# Altium PCB PCB4270Z_A00.PcbDoc (part 1 of 3)
Units mm, origin at the board's own origin, x right, y up, seen from the top; angles counter-clockwise.
Board outline 32 x 51 mm, 4 copper layers (Top Layer, Signal Layer 2, Signal Layer 3, Bottom Layer), stack 1.6 mm thick; 106 components, 90 nets, 404 pads, 564 vias.
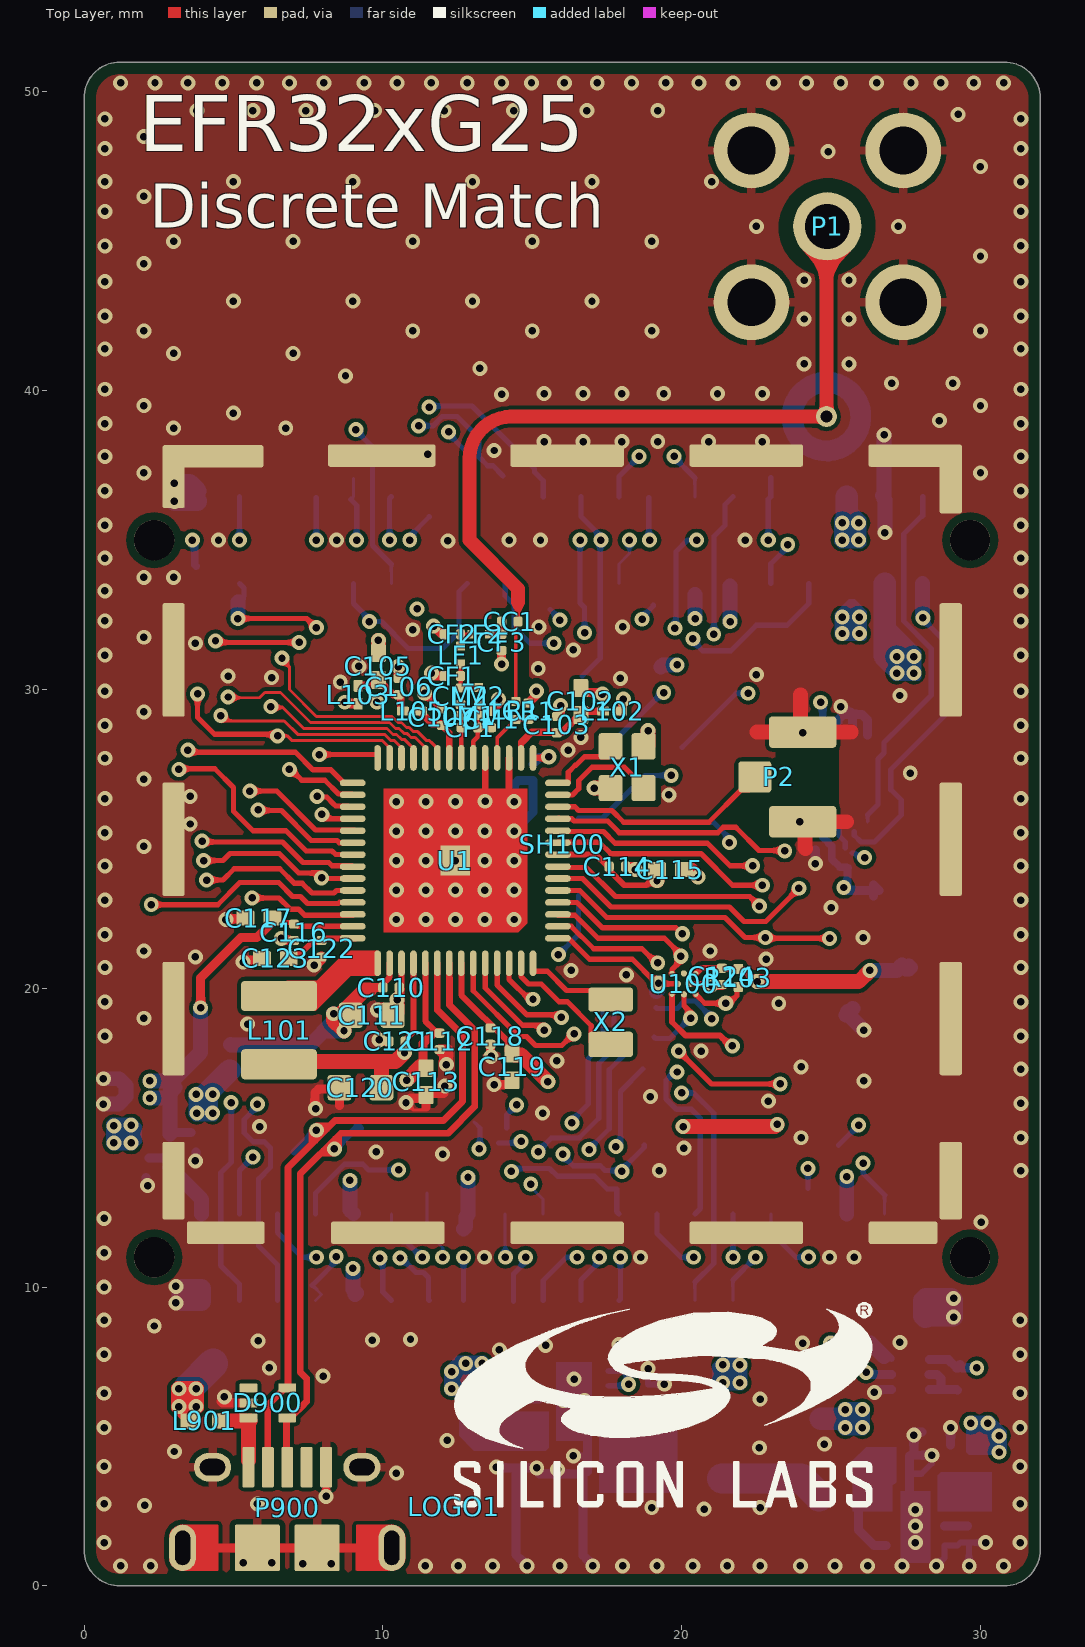
[diagram p0: Top Layer view]
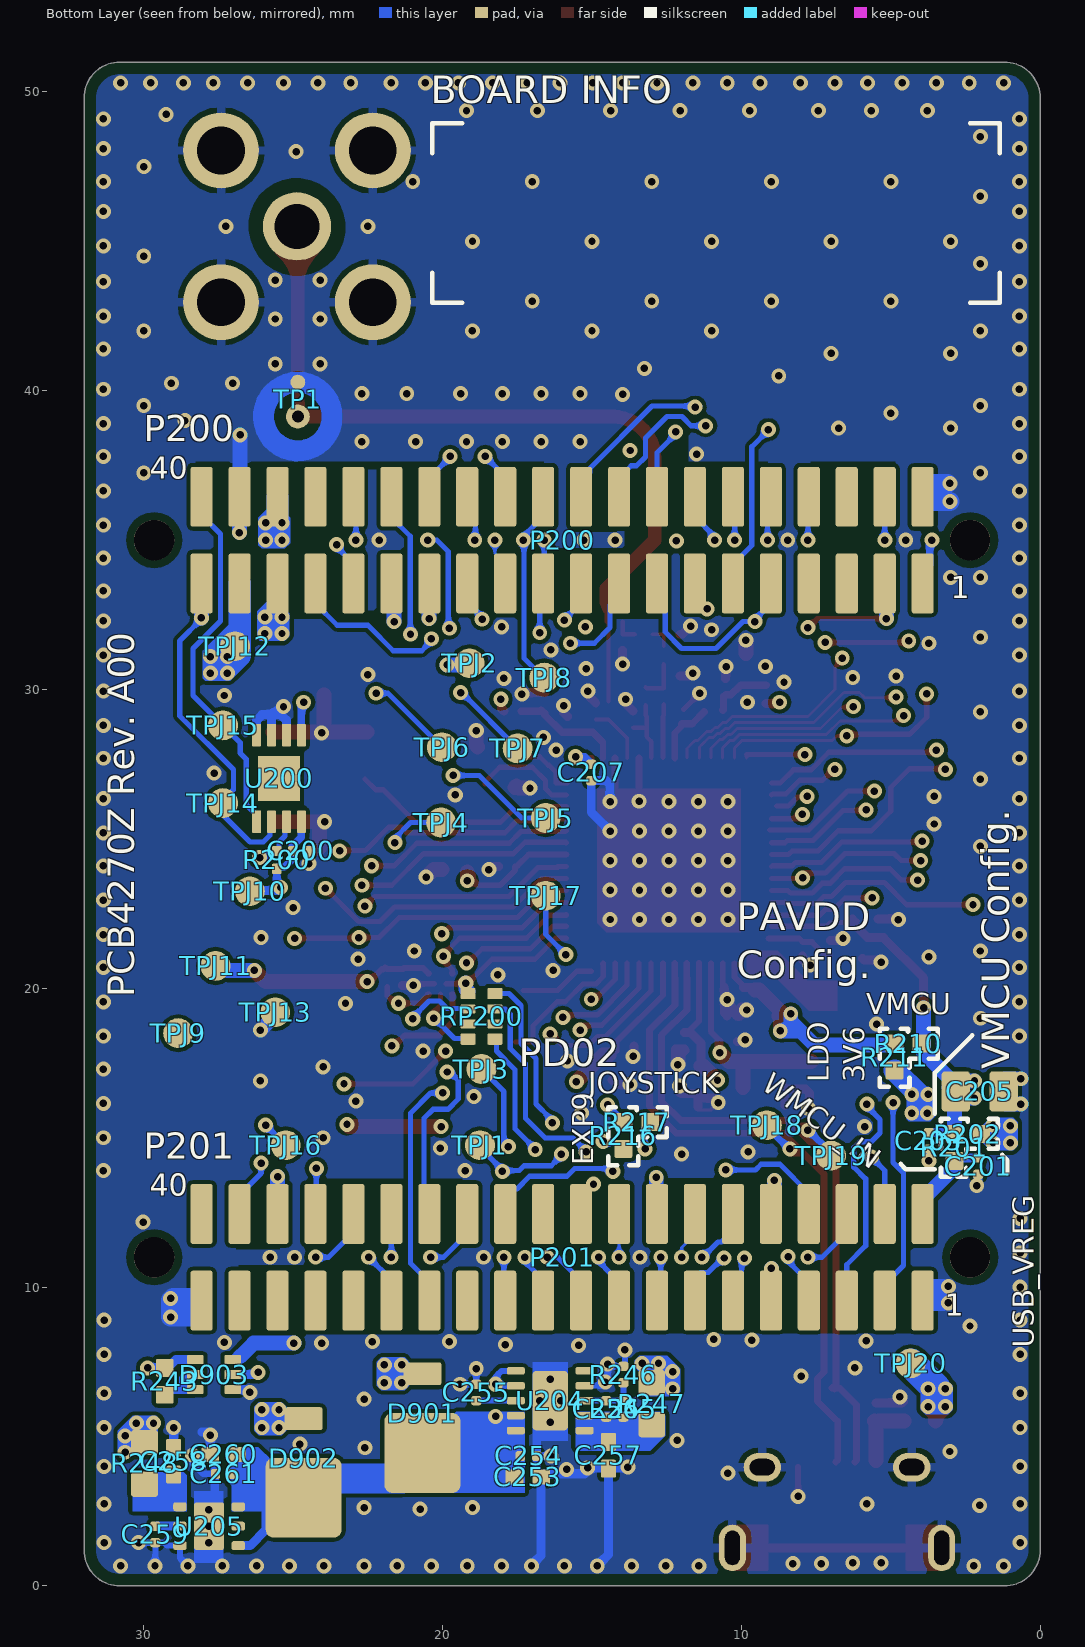
[diagram p1: Bottom Layer view, seen from below]
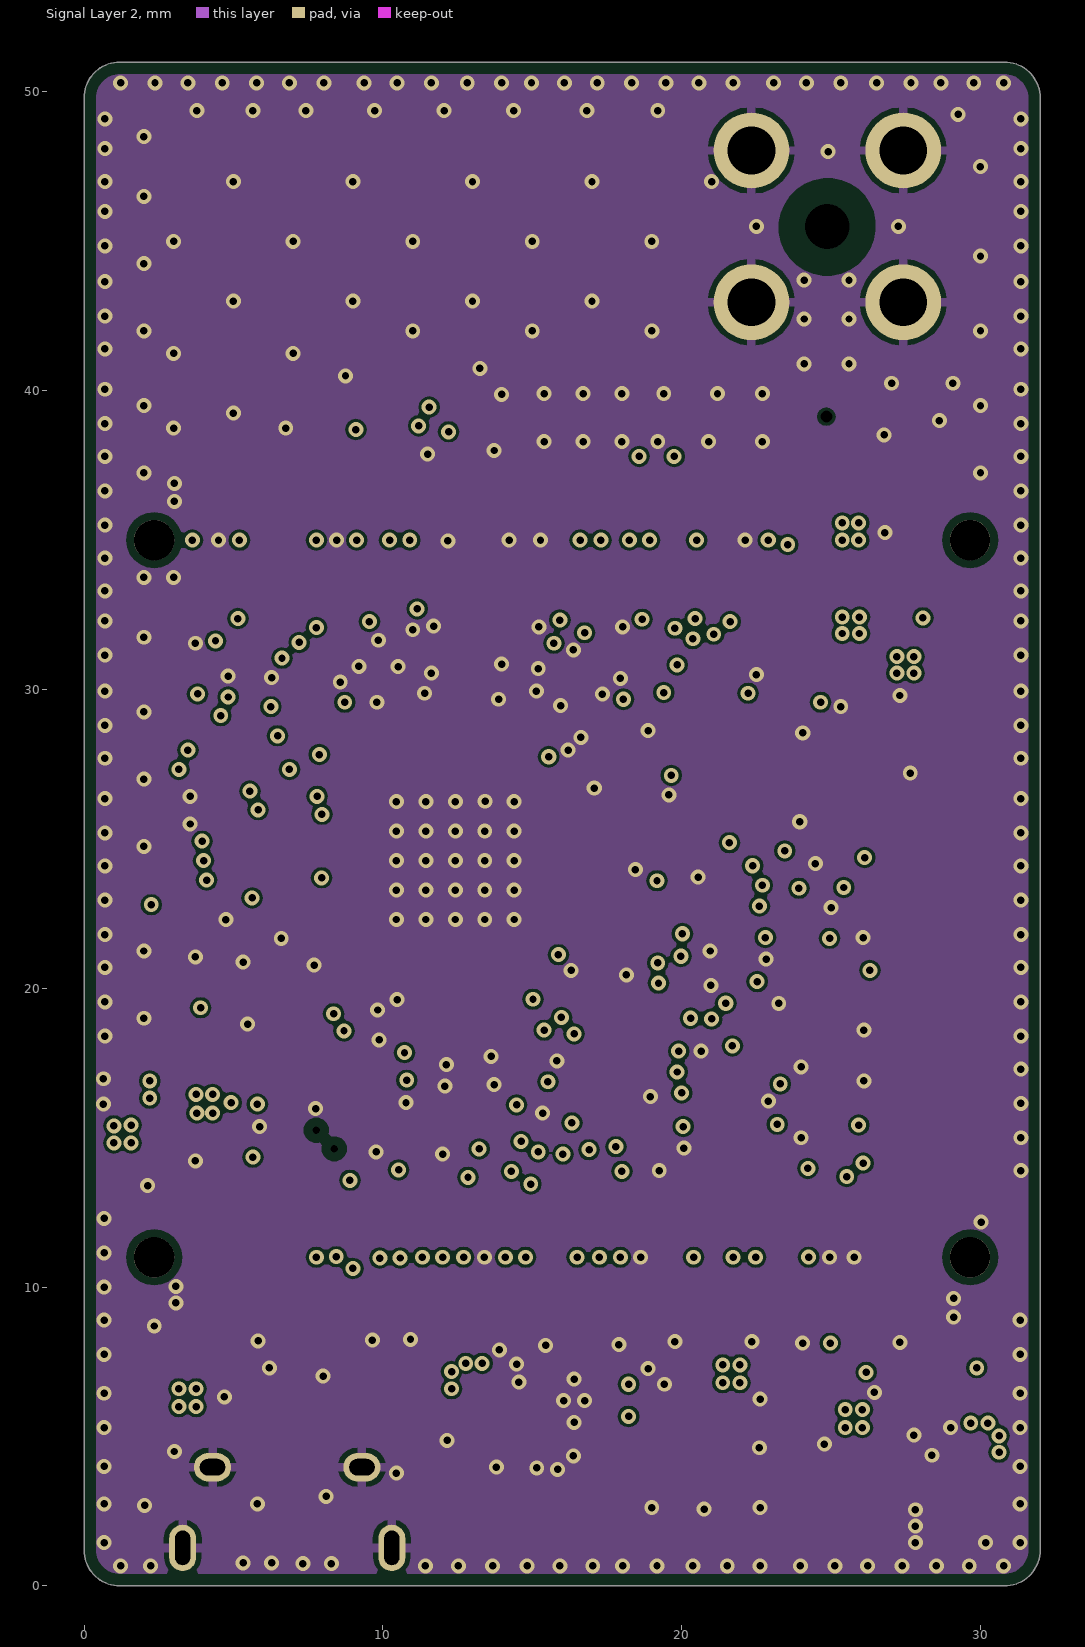
[diagram p2: Signal Layer 2]
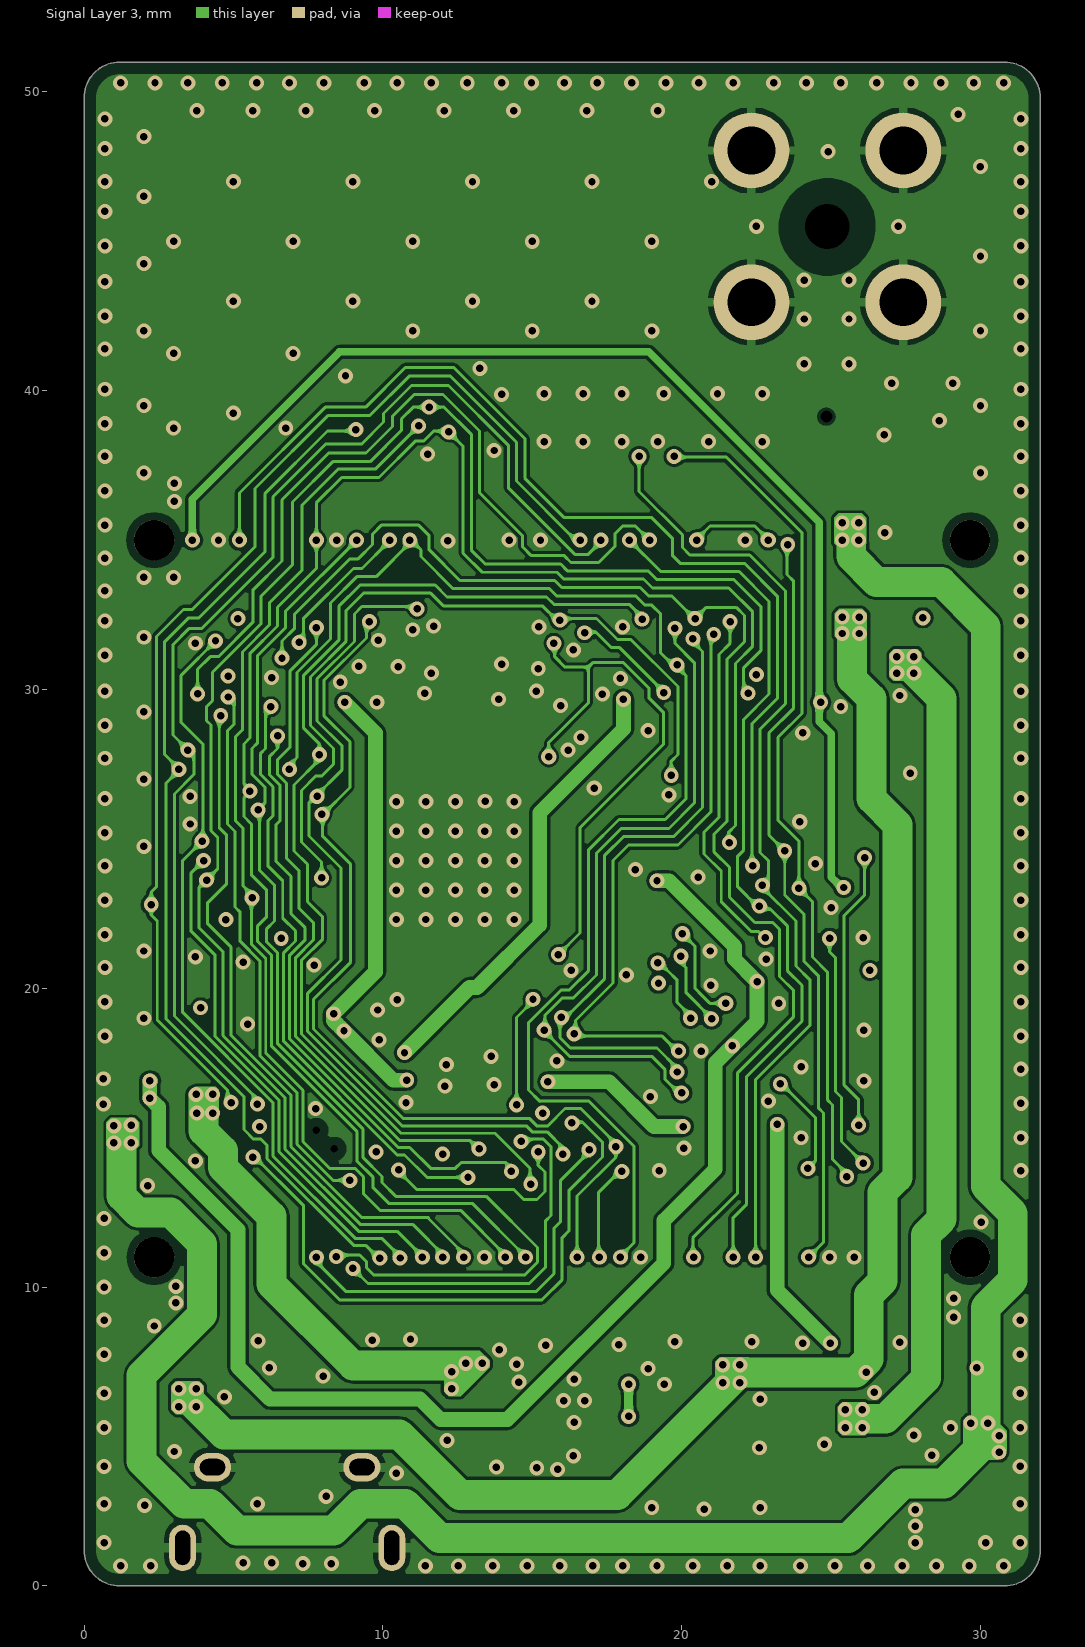
[diagram p3: Signal Layer 3]

## Layer stack, top to bottom
Top Solder: solder mask 0.0102, Solder Resist, Dk 3.5
Top Layer: signal copper 0.035
Dielectric 1: core 0.325, FR-4, Dk 4.2
Signal Layer 2: signal copper 0.018
Dielectric 3: prepreg 0.844, Dk 4.2
Signal Layer 3: signal copper 0.018
Dielectric 2: core 0.325, Dk 4.2
Bottom Layer: signal copper 0.035
Bottom Solder: solder mask 0.0102, Solder Resist, Dk 3.5

## Board outline
0,1.2 ccw(c1.2,1.2) 1.2,0 30.8,0 ccw(c30.8,1.2) 32,1.2 32,49.8 ccw(c30.8,49.8) 30.8,51 1.2,51 ccw(c1.2,49.8) 0,49.8

## Design rules (kind name [scope] priority, off if disabled: settings)
AcuteAngle [All] p1: minimum=7.00000000000000E+0001 checktracksonly=FALSE
BoardOutlineClearance [All] p1: gap=0.4
Clearance Clearance_50Ohm [InNetClass('50Ohm') vs InNet('GND')] p1: gap=0.254 except(0.15: Track-SMDPad; 0.2: SMDPad-SMDPad)
Clearance Clearance_to_Holes [InPadClass('NPTH')] p2: gap=0.254
Clearance Clearance_Outer_Layers_ThinGPIO [All vs OnLayer('Top Layer') and InNetClass('ThinGPIO')] p3: gap=0.1
Clearance Clearance_Outer_Layers [All vs OnLayer('Top Layer') or OnLayer('Bottom Layer')] p4: gap=0.127
Clearance Clearance_Inner_Layers [All vs OnLayer('Signal Layer 2') or OnLayer('Signal Layer 3')] p5: gap=0.1 except(0.175: Via-Via)
HoleToHoleClearance HoleToHoleClearance_ANT1toPAD [Incomponent ('ANT1') vs ISpad] p1: gap=0 allowstackedmicrovias=TRUE
HoleToHoleClearance HoleToHoleClearance_R1toR2_1 [Incomponent ('R1') vs Incomponent ('R2')] p2: gap=0 allowstackedmicrovias=TRUE
HoleToHoleClearance HoleToHoleClearance_U1toVIA_1 [InComponent ('U1') vs IsVia] p3: gap=0 allowstackedmicrovias=TRUE
HoleToHoleClearance [All] p4: gap=0.254 allowstackedmicrovias=TRUE
MinimumSolderMaskSliver [All] p1: minsoldermaskwidth=0.075
PolygonConnect Polygon_VIA_Connect [IsVia] p1: connectstyle=Direct reliefconductorwidth=0.254 reliefentries=4 polygonreliefangle="90 Angle" airgapwidth=0.254
PolygonConnect PolygonConnect_SH100 [InComponent('SH100')] p2: connectstyle=Direct reliefconductorwidth=0.254 reliefentries=4 polygonreliefangle="90 Angle" airgapwidth=0.127
PolygonConnect PolygonConnect_P1 [InComponent('P1') or InComponent('P900')] p3: connectstyle=Relief reliefconductorwidth=0.3 reliefentries=4 polygonreliefangle="90 Angle" airgapwidth=0.175
PolygonConnect [All] p4: connectstyle=NoConnect reliefconductorwidth=0.2 reliefentries=4 polygonreliefangle="90 Angle" airgapwidth=0.125
RoutingVias [All] p1: holewidth=0.3 width=0.65 viastyle="Through Hole" minholewidth=0.25 minwidth=0.5 maxholewidth=1 maxwidth=1.5
ShortCircuit ShortCircuit_ANTtoPAD [InNet('NetAT1_1') vs InNet('GND')] p1: allowed=TRUE
ShortCircuit ShortCircuit_R1toR2_1 [Incomponent ('R1') vs Incomponent ('R2')] p2: allowed=TRUE
ShortCircuit [All] p3: allowed=FALSE
SilkToSilkClearance [All] p1: silktosilkclearance=0.102
SilkToSolderMaskClearance [IsPad] p1: minsilkscreentomaskgap=0.102 clearancetoexposedcopper=TRUE
SolderMaskExpansion [All] p1: expansion=0.051
Width 50ohm [InNet('50R*')] p1: maxlimit=0.457 minlimit=0.124 preferedwidth=0.457
Width [All] p2: maxlimit=5.08 minlimit=0.1 preferedwidth=0.125
25 further rules are at their usual default settings.

## Classes and differential pairs
component class "05_ WSTK Connectors & B": C200 P200 P201 R200 TPJ1 TPJ2 TPJ3 TPJ4 TPJ5 TPJ6 TPJ7 TPJ8 TPJ9 TPJ10 TPJ11 TPJ12 TPJ13 TPJ14 TPJ15 TPJ16 TPJ17 TPJ18 TPJ19 TPJ20 U200
component class "04_ EFR32 Signal Assign": C124 C207 P2 R103 R216 R217 RP200 U1 U100 X2
component class "03_ Board Power": C201 C203 C205 C253 C254 C255 C256 C257 C258 C259 C260 C261 D900 D901 D902 D903 L901 P900 R201 R202 R243 R245 R246 R247 R248 U204 U205
component class "02_ RF & Power": C102 C103 C105 C106 C107 C110 C111 C112 C113 C114 C115 C116 C117 C118 C119 C120 C121 C122 C123 CC1 CF1 CF2 CF3 CM1 CM2 CP1 CR1 L101 L102 L103 L105 LF1 LF2 LM1 LM2 LR1 P1 R210 R211 SH100 SH101 TP1 X1
component class "01_ Title Page": PCB1
net class WSTK_P[45..0]: WSTK_P1 WSTK_P3 WSTK_P5 WSTK_P6 WSTK_P7 WSTK_P12 WSTK_P13 WSTK_P19 WSTK_P22 WSTK_P28 WSTK_P30 WSTK_P32 WSTK_P34 WSTK_P36 WSTK_P37 WSTK_P38 WSTK_P39 WSTK_P40
net class WSTK_F[21..0]: WSTK_F4 WSTK_F10 WSTK_F11 WSTK_F12 WSTK_F13 WSTK_F14 WSTK_F15 WSTK_F16 WSTK_F17 WSTK_F18 WSTK_F19 WSTK_F20 WSTK_F21
pad class NPTH: P200-M1 P200-M2 P201-M1 P201-M2
net class EFR32_PA[11..0]: EFR32_PA0 EFR32_PA1 EFR32_PA2 EFR32_PA3 EFR32_PA4 EFR32_PA5 EFR32_PA6 EFR32_PA7 EFR32_PA8 EFR32_PA9 EFR32_PA10 EFR32_PA11

## Components (designator, comment, footprint, x,y, rotation, side; value= is the part's Value field where it differs from the comment)
C102 "1U" C0402_L 16.625,29.6 r90 top
C103 "100P" C0201_L 15.825,28.825 r90 top
C105 "470N" C0402_L 9.85,30.775 r90 top
C106 "100P" C0201_L 10.525,30.1 r90 top
C107 "100P" C0201_L 11.975,29.075 r90 top
C110 "100N" C0201_L 10.275,20.025 r0 top
C111 "10U" C0603_L 9.625,19.1 r0 top
C112 "10N" C0201_L 11.9,18.225 r270 top
C113 "1U" C0402_L 11.45,16.875 r270 top
C114 "100N" C0201_L 17.85,24.075 r0 top
C115 "1U" C0402_L 19.625,23.975 r0 top
C116 "100N" C0201_L 7.025,21.875 r270 top
C117 "1U" C0402_L 5.85,22.35 r180 top
C118 "100N" C0201_L 13.6,18.4 r270 top
C119 "1U" C0402_L 14.325,17.375 r270 top
C120 "4U7" C0603_L 9.25,16.675 r180 top
C121 "100N" C0201_L 10.475,18.225 r180 top
C122 "100N" C0201_L 7.95,21.325 r270 top
C123 "1U" C0402_L 6.4,21 r180 top
C124 "100N" C0201_L 21.35,20.4 r270 top
C200 "100N" C0201_L 24.75,24.6 r180 bottom
C201 "100N" C0201_L 2.075,14.05 r270 bottom
C203 "100N" C0201_L 3.725,14.9 r270 bottom
C205 "10U" C0805_L 2.025,16.55 r180 bottom
C207 "100N" C0201_L 15.025,27.225 r270 bottom
C253 "1U" C0402_L 17.15,3.65 r180 bottom
C254 "100N" C0201_L 17.125,4.35 r180 bottom
C255 "100N" C0201_L 18.875,6.475 r90 bottom
C256 "10N" C0201_L 14.525,5.925 r90 bottom
C257 "10U" C0402_L 14.45,4.375 r270 bottom
C258 "2U2" C0402_L 29,4.175 r90 bottom
C259 "100N" C0201_L 29.615,1.725 r270 bottom
C260 "1U" C0402_L 27.325,4.4 r0 bottom
C261 "100N" C0201_L 27.325,3.75 r0 bottom
CC1 "100pF" C0201_L 14.25,32.275 r0 top
CF1 "4.7pF" C0201_L 12.325,30.45 r180 top
CF2 "10pF" C0201_L 12.325,31.85 r180 top
CF3 "5.1pF" C0201_L 13.975,31.575 r270 top
CM1 "10pF" C0201_L 13.625,29 r90 top
CM2 "4.3pF" C0201_L 12.6,29.775 r90 top
CP1 "1.5pF" C0201_L 12.9,28.725 r0 top
CR1 "Unused" C0201_L 14.875,29.275 r90 top
D900 "SP1001-04" SOT553_L 6.15,6.125 r0 top
D901 "SS3P3" DO-220AA 20.675,5.3 r90 bottom
D902 "SS3P3" DO-220AA 24.65,3.8 r90 bottom
D903 "FDY4000CZ" SOT-563 27.65,7.075 r0 bottom
Designator39 "Comment" PCB_SPEC_4_LAYER -67.7,114.2 r0 top
L101 "2U2" COIL_1008_L 6.525,18.6 r270 top
L102 "BLM03AG700SN1D" COIL_MUR_BLM03_0201 17.675,29.275 r180 top
L103 "0R" COIL_MUR_BLM03_0201 9.175,29.825 r90 top
L105 "BLM03PG330SN1D" COIL_MUR_BLM03_0201 10.975,29.275 r0 top
L901 "782422221" COIL_0402 4.025,5.525 r180 top
LF1 "6.8nH" COIL_0201_L 12.6,31.15 r90 top
LF2 "6.8nH" COIL_0201_L 13.275,31.85 r0 top
LM1 "22nH" COIL_0201_L 12.9,29.125 r0 top
LM2 "5.6nH" COIL_0201_L 13.2,29.775 r90 top
LOGO1 "Comment" LOGO_SILABS_W14.0 12.375,2.65 r0 top
LR1 "20nH" COIL_0201_L 14.45,29.3 r90 top
P1 "SMA" TE_SMA_1814832_TH_VER 24.875,45.5 r0 top
P2 "U.FL" HIROSE_U.FL-R-SMT-1 24.05,27.075 r90 top
P200 "SOCKET_WCON_2X20_1.27MM_SMD" SAM_SFC-120-T2-D-A-2X20_SNUM 16,35 r0 bottom locked
P201 "SOCKET_WCON_2X20_1.27MM_SMD" SAM_SFC-120-T2-D-A-2X20_SNUM 16,11 r0 bottom locked
P900 "USB MICRO-B" AMP_FCI_10118194 6.805,-0.175 r0 top
R103 "330K" R0201_L#1 21.9,20.35 r90 top
R200 "10K" R0201_L#1 25.55,24.3 r270 bottom
R201 "0R" R0402_L 2.875,14.675 r270 bottom
R202 "0R" R0402_L 2.425,15.125 r180 bottom
R210 "0R" R0402_L 4.425,18.15 r0 bottom
R211 "0R" R0402_L 4.875,17.7 r90 bottom
R216 "0R" R0402_L 13.95,15.075 r90 bottom
R217 "0R" R0402_L 13.5,15.525 r180 bottom
R243 "33k" R0402_L 29.3,6.85 r270 bottom
R245 "4.02k" R0201_L#2 13.95,5.925 r270 bottom
R246 "1.15k" R0201_L#2 13.95,7.075 r270 bottom
R247 "0R" R0603_L 13,6.1 r90 bottom
R248 "0R" R0603_L 29.975,4.1 r90 bottom
RP200 "100R" RES_MNR04-8_PCB4270 18.7,19.062 r270 bottom
SH100 "RF_SHIELD_FRAME_BMI-S-203-F" RF_SHIELD_FRAME_BMI-S-203-F_PCB4270 16,24.825 r0 top locked
TP1 "TP_RF" "TP_INGUN_50_OHM_CLOSED OPENVIA" 24.845,39.135 r0 bottom
TPJ1 "TPJ_SMD" TP_1.0_SMD 18.75,14.75 r90 bottom locked
TPJ2 "TPJ_SMD" TP_1.0_SMD 19.1,30.88 r90 bottom locked
TPJ3 "TPJ_SMD" TP_1.0_SMD 18.7,17.3 r90 bottom locked
TPJ4 "TPJ_SMD" TP_1.0_SMD 20.05,25.55 r90 bottom locked
TPJ5 "TPJ_SMD" TP_1.0_SMD 16.55,25.7 r90 bottom locked
TPJ6 "TPJ_SMD" TP_1.0_SMD 20.02,28.07 r90 bottom locked
TPJ7 "TPJ_SMD" TP_1.0_SMD 17.49,28.03 r90 bottom locked
TPJ8 "TPJ_SMD" TP_1.0_SMD 16.6,30.4 r90 bottom locked
TPJ9 "TPJ_SMD" TP_1.0_SMD 28.85,18.5 r90 bottom locked
TPJ10 "TPJ_SMD" TP_1.0_SMD 26.45,23.25 r90 bottom locked
TPJ11 "TPJ_SMD" TP_1.0_SMD 27.6,20.75 r90 bottom locked
TPJ12 "TPJ_SMD" TP_1.0_SMD 26.95,31.45 r90 bottom locked
TPJ13 "TPJ_SMD" TP_1.0_SMD 25.6,19.2 r90 bottom locked
TPJ14 "TPJ_SMD" TP_1.0_SMD 27.35,26.2 r90 bottom locked
TPJ15 "TPJ_SMD" TP_1.0_SMD 27.35,28.8 r90 bottom locked
TPJ16 "TPJ_SMD" TP_1.0_SMD 25.25,14.75 r90 bottom locked
TPJ17 "TPJ_SMD" TP_1.0_SMD 16.55,23.1 r90 bottom locked
TPJ18 "TPJ_SMD" TP_1.0_SMD 9.15,15.42 r90 bottom locked
TPJ19 "TPJ_SMD" TP_1.0_SMD 7,14.4 r90 bottom locked
TPJ20 "TPJ_SMD" TP_1.0_SMD 4.34,7.45 r90 bottom locked
U1 "EFR32FG25B222F1920IM56" QFN56_M040_7.0X7.0_EP_SL 12.425,24.275 r180 top
U100 "MX25R8035F" BGA8_M040_1.24X1.75_WLCSP_PCB4270 20.075,20.15 r270 top
U200 "M24C02" TDFN8_M050_2.0X3.0_EP 25.475,27.025 r270 bottom
U204 "TPS7A92" WFDFN-10_EP_TPS7A92 16.4,6.2 r0 bottom
U205 "TPS79933DRVR" SON-6_EP_TPS79933DDCR 27.815,2 r180 bottom
X1 "39.000 MHz" KDS_DSX211SH_2016 18.175,27.4 r270 top
X2 "32.768 kHz" X_MCS_CM8V-T1A 17.625,18.875 r270 top

## Footprints (in the part's own frame and the unit in brackets; to place one, negate y for a bottom-side part, rotate by r counter-clockwise, add the part's x,y. Pads: shape width x height; smd on the part's side, far side on the other; paste and mask are expansions set on the pad)
AMP_FCI_10118194 [mm] "Amphenol FCI, 10118194-000XLF, Micro USB Type B (171108)"
  rrect20% 0.4x1.35 smd mask+0.076: 1(-1.305,4.15) 2(-0.655,4.15) 3(-0.005,4.15) 4(0.645,4.15) 5(1.295,4.15)
  oval 1.25x0.95 hole 0.55 slot 0.85 at 0 deg: 6(-2.505,4.15) 7(2.495,4.15)
  oval 0.9x1.55 hole 0.5 slot 1.15 at 90 deg paste+0: 8(-3.505,1.45) 9(3.495,1.45)
  rrect5% 1.5x1.55 smd: 10(-1.005,1.45) 11(0.995,1.45)
  Top Layer region: -3.501,0.676 -2.33,0.676 -2.306,0.7 -2.308,2.206 -2.33,2.228 -3.497,2.228 -3.587,2.228 -3.754,2.159 -3.881,2.031 -3.95,1.865 -3.95,1.775 -3.95,1.775 -3.95,1.125 -3.95,1.036 -3.882,0.871 -3.755,0.744 -3.59,0.676 -3.501,0.676
  Top Layer region: 3.476,0.676 2.32,0.676 2.296,0.7 2.298,2.206 2.32,2.228 3.472,2.228 3.567,2.228 3.743,2.155 3.877,2.021 3.95,1.845 3.95,1.75 3.95,1.75 3.95,1.15 3.95,1.056 3.878,0.882 3.744,0.748 3.57,0.676 3.476,0.676
  body extent -4.05,-1.18 4,4.4, height 3.12
BGA8_M040_1.24X1.75_WLCSP_PCB4270 [mm] "BGA, 8 pin. U100"
  round 0.17 smd paste+0.02 mask+0.058: A1(-0.35,0.4) A3(0.35,0.4) E1(-0.35,-0.4) E3(0.35,-0.4)
  round 0.21 smd mask+0.038: B2(0,0.2) C1(-0.35,0) C3(0.35,0) D2(0,-0.2)
  Top Layer region: -0.263,-0.341 -0.263,-0.459 -0.301,-0.493 -0.35,-0.505 -0.35,-0.505 -0.403,-0.491 -0.441,-0.452 -0.455,-0.4 -0.455,-0.4 -0.447,-0.36 -0.424,-0.326 -0.39,-0.303 -0.35,-0.295 -0.35,-0.295 -0.301,-0.307 -0.263,-0.341
  Top Layer region: -0.263,0.459 -0.263,0.341 -0.301,0.307 -0.35,0.295 -0.35,0.295 -0.403,0.309 -0.441,0.348 -0.455,0.4 -0.455,0.4 -0.447,0.44 -0.424,0.474 -0.39,0.497 -0.35,0.505 -0.35,0.505 -0.301,0.493 -0.263,0.459
  Top Layer region: 0.263,0.341 0.263,0.459 0.301,0.493 0.35,0.505 0.35,0.505 0.403,0.491 0.441,0.452 0.455,0.4 0.455,0.4 0.447,0.36 0.424,0.326 0.39,0.303 0.35,0.295 0.35,0.295 0.301,0.307 0.263,0.341
  Top Layer region: 0.263,-0.459 0.263,-0.341 0.301,-0.307 0.35,-0.295 0.35,-0.295 0.403,-0.309 0.441,-0.348 0.455,-0.4 0.455,-0.4 0.447,-0.44 0.424,-0.474 0.39,-0.497 0.35,-0.505 0.35,-0.505 0.301,-0.493 0.263,-0.459
  body extent -0.63,-0.89 0.63,0.88, height 0.52
C0201_L [mm] "Capacitor, Chip; 0.60 mm L X 0.30 mm W X 0.33 mm H body"
  rrect52% 0.31x0.34 smd: 1(-0.275,0) 2(0.275,0)
  body extent -0.3,-0.15 0.3,0.15, height 0.3
C0402_L [mm] "Chip Capacitor, 2-Leads, Body 1.0x0.5mm, IPC High Density"
  rrect20% 0.6x0.5 smd mask+0.051: 1(-0.45,0) 2(0.45,0)
  body extent -0.5,-0.25 0.5,0.25, height 0.6
C0603_L [mm] "Capacitor, 0603, High Density (C)"
  rrect25% 0.8x0.85 smd: 1(-0.7,0) 2(0.7,0)
  body extent -0.8,-0.4 0.8,0.4, height 0.95
C0805_L [mm] "Capacitor, 0805"
  rrect25% 0.95x1.35 smd: 1(-0.8,0) 2(0.8,0)
  body extent -1.1,-0.72 1.1,0.72, height 1.45
COIL_0201_L [mm] "JELF243C-0021"
  rrect10% 0.3x0.3 smd: 1(-0.3,0) 2(0.3,0)
  body extent -0.32,-0.17 0.32,0.17, height 0.33
COIL_0402 [mm] "COIL_0402_L (3D from Wurth) (190308)"
  rrect20% 0.55x0.5 smd mask+0.051: 1(-0.525,0) 2(0.525,0)
  body extent -0.5,-0.25 0.5,0.25, height 0.5
COIL_1008_L [mil] "Chip Inductors, 1008 (2520), Coilcraft (190207)"
  rrect25% 40x100 smd: 1(-45,0) 2(45,0)
  body extent -58,-55 57,55, height 80
COIL_MUR_BLM03_0201 [mm] "COIL_MUR_BLM03_0201"
  rrect25% 0.4x0.3 smd mask+0.051: 1(-0.3,0) 2(0.3,0)
  body extent -0.3,-0.15 0.3,0.15, height 0.95
DO-220AA [mm] "Diode DO220AA (DO-220AA) (= SMP) (Vishay)"
  rrect20% 2.67x2.54 smd: 1(-0.85,0)
  rrect20% 0.762x1.27 smd: 2(1.8,0)
  body extent -2,-1.09 2.1,1.09, height 1.15
HIROSE_U.FL-R-SMT-1 [mm] "COAX_HIROSE_U.FL_CL331-0471"
  rrect20% 1.05x1.1 smd mask+0.051: 1(0,1.6)
  rrect20% 1.05x2.25 smd mask+0.051: 2(-1.5,0) 3(1.5,0)
  Top Layer pour cut-out: -0.85,0.9 0.85,0.9 0.85,0.9 0.85,-1.2 -0.85,-1.2 -0.85,-1.2
  body extent -1.3,-1.55 1.3,1.3, height 0.9
KDS_DSX211SH_2016 [mm] "Copy of Silabs CE  X_KDS_DSX211SH_2.0X1.65-4"
  rrect20% 0.875x0.8 smd mask+0.051: 1(-0.7,-0.55) 2(0.7,-0.55) 3(0.7,0.55) 4(-0.7,0.55)
  body extent -1.07,-0.87 1.08,0.88, height 0.5
LOGO_SILABS_W14.0 [mm] "LOGO_SILABS_W14.0"
  silkscreen extent 0.03,0 13.99,6.83
PCB_SPEC_4_LAYER [mm]
QFN56_M040_7.0X7.0_EP_SL [mm]
  rect 1x1 smd: 0(0,0)
  oval 0.86x0.22 smd: 1(-3.435,2.6) 2(-3.435,2.2) 3(-3.435,1.8) 4(-3.435,1.4) 5(-3.435,1) 6(-3.435,0.6) 7(-3.435,0.2) 8(-3.435,-0.2) 9(-3.435,-0.6) 10(-3.435,-1) 11(-3.435,-1.4) 12(-3.435,-1.8) 13(-3.435,-2.2) 14(-3.435,-2.6) 29(3.435,-2.6) 30(3.435,-2.2) 31(3.435,-1.8) 32(3.435,-1.4) 33(3.435,-1) 34(3.435,-0.6) 35(3.435,-0.2) 36(3.435,0.2) 37(3.435,0.6) 38(3.435,1) 39(3.435,1.4) 40(3.435,1.8) 41(3.435,2.2) 42(3.435,2.6)
  oval 0.22x0.86 smd: 15(-2.6,-3.435) 16(-2.2,-3.435) 17(-1.8,-3.435) 18(-1.4,-3.435) 19(-1,-3.435) 20(-0.6,-3.435) 21(-0.2,-3.435) 22(0.2,-3.435) 23(0.6,-3.435) 24(1,-3.435) 25(1.4,-3.435) 26(1.8,-3.435) 27(2.2,-3.435) 28(2.6,-3.435) 43(2.6,3.435) 44(2.2,3.435) 45(1.8,3.435) 46(1.4,3.435) 47(1,3.435) 48(0.6,3.435) 49(0.2,3.435) 50(-0.2,3.435) 51(-0.6,3.435) 52(-1,3.435) 53(-1.4,3.435) 54(-1.8,3.435) 55(-2.2,3.435) 56(-2.6,3.435)
  Top Layer pour cut-out: -3,-2.675 -2.675,-3 2.725,-3 3,-2.725 3,2.75 2.75,3 -2.725,3 -3,2.725
  Top Layer region: 2.4,-2.4 -2.4,-2.4 -2.4,2.1 -2.1,2.4 2.4,2.4
  body extent -3.5,-3.5 3.5,3.5, height 0.86
R0201_L#1 [mm] "Resistor (Chip2PinSM127P600-8N) (170921)"
  rrect25% 0.34x0.32 smd: 1(-0.3,0) 2(0.3,0)
  body extent -0.32,-0.13 0.32,0.13, height 0.3
R0201_L#2 [mm] "Resistor, Chip; 0.60 mm L X 0.30 mm W X 0.28 mm H body"
  rrect52% 0.31x0.34 smd: 1(-0.275,0) 2(0.275,0)
  body extent -0.3,-0.15 0.3,0.15, height 0.23
R0402_L [mm] "Chip Resistor, 2-Leads, Body 1.0x0.5mm, IPC High Density"
  rrect20% 0.6x0.6 smd mask+0.051: 1(-0.45,0) 2(0.45,0)
  body extent -0.5,-0.25 0.5,0.25, height 0.6
R0603_L [mm] "Chip Resistor, 0603, High density, Level C (_L) (170210)"
  rrect25% 0.85x0.9 smd: 1(-0.7,0) 2(0.7,0)
  body extent -0.8,-0.4 0.8,0.4, height 0.95
RES_MNR04-8_PCB4270 [mm] "Chip resistor network 8pin"
  rrect20% 0.375x0.5 smd mask+0.051: 1(-0.763,-0.45) 4(0.763,-0.45) 5(0.763,0.45) 8(-0.763,0.45)
  rrect20% 0.3x0.5 smd mask+0.051: 2(-0.25,-0.45) 3(0.25,-0.45) 6(0.25,0.45) 7(-0.25,0.45)
  body extent -1,-0.4 1,0.4, height 0.5
RF_SHIELD_FRAME_BMI-S-203-F_PCB4270 [mm] "RF_SHIELD_FRAME_BMI-S-203-F"
  rrect20% 0.75x3.8 smd paste+0 mask+0.05: 1(-13.005,-5.835) 1(-13.005,0.165) 1(-13.005,6.165) 1(13.005,-5.835) 1(13.005,0.165) 1(13.005,6.165)
  rrect20% 0.75x2.6 smd paste+0 mask+0.05: 1(-13.005,-11.259) 1(13.005,-11.259)
  rrect20% 0.75x2.1 smd paste+0 mask+0.05: 1(-13.005,12.294)
  oval 0.75x0.254 smd paste+0 mask+0.05: 1(-13.004,12.994) 1(12.994,12.994) 1(12.994,12.994) 1(12.994,12.994)
  rrect20% 3.375x0.75 smd paste+0 mask+0.05: 1(-11.684,12.979)
  rrect20% 2.6x0.75 smd paste+0 mask+0.05: 1(-11.259,-13.005)
  rrect20% 3.6x0.75 smd paste+0 mask+0.05: 1(-6.035,13.005)
  rrect20% 3.8x0.75 smd paste+0 mask+0.05: 1(-5.835,-13.005) 1(0.165,-13.005) 1(0.165,13.005) 1(6.165,-13.005) 1(6.165,13.005)
  rrect20% 2.3x0.75 smd paste+0 mask+0.05: 1(11.411,-13.005)
  rrect20% 3.125x0.75 smd paste+0 mask+0.05: 1(11.811,13.005)
  rrect20% 0.75x2.3 smd paste+0 mask+0.05: 1(13.005,12.217)
  body extent -13.3,-13.3 13.3,13.3, height 5.5
SAM_SFC-120-T2-D-A-2X20_SNUM [mm]
  rrect20% 0.74x2 smd mask+0.05: 1(-12.065,1.45) 2(-12.065,-1.45) 3(-10.795,1.45) 4(-10.795,-1.45) 5(-9.525,1.45) 6(-9.525,-1.45) 7(-8.255,1.45) 8(-8.255,-1.45) 9(-6.985,1.45) 10(-6.985,-1.45) 11(-5.715,1.45) 12(-5.715,-1.45) 13(-4.445,1.45) 14(-4.445,-1.45) 15(-3.175,1.45) 16(-3.175,-1.45) 17(-1.905,1.45) 18(-1.905,-1.45) 19(-0.635,1.45) 20(-0.635,-1.45) 21(0.635,1.45) 22(0.635,-1.45) 23(1.905,1.45) 24(1.905,-1.45) 25(3.175,1.45) 26(3.175,-1.45) 27(4.445,1.45) 28(4.445,-1.45) 29(5.715,1.45) 30(5.715,-1.45) 31(6.985,1.45) 32(6.985,-1.45) 33(8.255,1.45) 34(8.255,-1.45) 35(9.525,1.45) 36(9.525,-1.45) 37(10.795,1.45) 38(10.795,-1.45) 39(12.065,1.45) 40(12.065,-1.45)
  round 1.35 hole 1.35 unplated paste-5.563 mask-5.563: M1(13.652,0) M2(-13.652,0)
  body extent -14.29,-2.1 14.29,2.16, height 4.67
SON-6_EP_TPS79933DDCR [mm]
  rrect50% 0.45x0.3 smd mask+0.05: 1(-0.975,0.65) 2(-0.975,0) 3(-0.975,-0.65) 4(0.975,-0.65) 5(0.975,0) 6(0.975,0.65)
  rrect15% 1x1.6 smd paste-2 mask+0.05: 7(0,0)
  rrect25% 1x0.7 on Bottom Paste paste+0: ""(0,-0.45) ""(0,0.45)
  body extent -1.04,-1.04 1.04,1.04, height 0.76
SOT553_L [mm] "SOT553 (_M050_W1.2_), 5-Leads, Body 1.60x1.20mm, Pitch 0.5mm, HiDens (180615)"
  rrect25% 0.6x0.3 smd: 1(-0.65,0.5) 2(-0.65,0) 3(-0.65,-0.5) 4(0.65,-0.5) 5(0.65,0.5)
  body extent -0.65,-0.85 0.65,0.85, height 0.6
SOT-563 [mm] "diodes DT1446-04V"
  rrect20% 0.55x0.3 smd paste+0 mask+0.051: 1(-0.625,0.5) 2(-0.625,0) 3(-0.625,-0.5) 4(0.625,-0.5) 5(0.625,0) 6(0.625,0.5)
  body extent -0.6,-0.8 0.6,0.8, height 0.61
TDFN8_M050_2.0X3.0_EP [mm] "TDFN8_M050_2.0x3.0_EP"
  rrect20% 0.75x0.3 smd mask+0.051: 1(-1.45,0.75) 2(-1.45,0.25) 3(-1.45,-0.25) 4(-1.45,-0.75) 5(1.45,-0.75) 6(1.45,-0.25) 7(1.45,0.25) 8(1.45,0.75)
  rect 1.5x1.4 smd mask+0.051: 9(0,0)
  body extent -1.5,-1 1.5,1, height 1.01
TE_SMA_1814832_TH_VER [mm]
  round 2.286 / inner round 0 / far side round 2.286 hole 1.5: 1(0,0)
  round 2.54 hole 1.6: 2(-2.54,-2.54) 3(2.54,-2.54) 4(2.54,2.54) 5(-2.54,2.54)
  body extent -3.2,-3.2 3.2,3.2, height 9.5
TP_1.0_SMD [mm] "Test Point, 1.0 mm, SMD"
  round 1 smd paste-0.501: 1(0,0)
  body extent -0.2,-0.2 0.2,0.2, height 0.01
"TP_INGUN_50_OHM_CLOSED OPENVIA" [mm] "TP_INGUN_50_OHM_CLOSED"
  round 0.8 / inner round 0 / far side round 0.7 hole 0.4 mask+0: 1(0,0)
  round 0.5 smd paste-0.255 mask-0.41: 2(0,-1.15)
  Top Layer pour cut-out: 0,-0.8 0.4,-0.693 0.693,-0.4 0.8,0 0.693,0.4 0.4,0.693 0,0.8 0,0.8 -0.347,0.721 -0.625,0.499 -0.78,0.178 -0.78,-0.178 -0.625,-0.499 -0.347,-0.721 0,-0.8
  Top Layer lines w0.7: -1.15,0 ccw(c0,0) 0,-1.15 ccw(c0,0) -1.15,0
WFDFN-10_EP_TPS7A92 [mm]
  rrect50% 0.6x0.25 smd mask+0.05: 1(-1.15,1) 2(-1.15,0.5) 3(-1.15,0) 4(-1.15,-0.5) 5(-1.15,-1) 6(1.15,-1) 7(1.15,-0.5) 8(1.15,0) 9(1.15,0.5) 10(1.15,1)
  rrect25% 1.2x2 smd paste-2 mask+0.05: 11(0,0)
  rrect15% 1.13x0.89 on Bottom Paste paste+0: ""(0,-0.525) ""(0,0.525)
  body extent -1.25,-1.25 1.25,1.25, height 0.76
X_MCS_CM8V-T1A [mm] "Crystal MCS CM8V-T1A (2 pin)"
  rrect25% 0.8x1.5 smd mask+0.051: 1(-0.75,0)
  rrect25% 0.85x1.5 smd mask+0.051: 2(0.75,0)
  body extent -1,-0.6 1,0.6, height 0.95

## Part data
C102 C105 C113 C115 C117 C119 C123 C253 C257 C258 C260: library part C0402
C103 C106 C107 C110 C112 C114 C116 C118 C121 C122 C124 C200 C201 C203 C207 C254 C255 C256 C259 C261 CC1 CF1 CF2 CF3 CM1 CM2 CP1 CR1: library part C0201
C111 C120: library part C0603
C205: library part CAPACITOR
L101: library part L1008
L102 L103 L105: library part BLM03AX
L901: library part WE-CBA
LF1 LF2 LM1 LM2 LR1: library part L0201
P1: library part SMA_TH_WELLSHOW
P2: library part KLS_U.FL
P900: library part "KLS L-KLS1-238-0-0-0"
R103 R200 R245 R246: library part R0201
R201 R202 R210 R211 R216 R217 R243: library part R0402
R247 R248: library part R0603
RP200: library part MNR04M0APJ101
TPJ1 TPJ2 TPJ3 TPJ4 TPJ5 TPJ6 TPJ7 TPJ8 TPJ17: library part TPJ_SMD_Dup1
U1: library part EFR32xG25_QFN56_HFCLKOUT
U100: library part MX25R8035
X1: library part DSX211SH
X2: library part CM8V-T1A

## Via types
v1: diameter 0.5, hole 0.25, Top Layer to Bottom Layer, tented both sides, 540 vias
v2: diameter 0.508, hole 0.25, Top Layer to Bottom Layer, tented both sides, 22 vias
v3: diameter 0.5/0/0/0.5 (per signal layer), hole 0.25, Top Layer to Bottom Layer, tented both sides, 2 vias

## Nets (pads, with @x,y where several pads share a name; then routed paths per layer and width w, separated by ;. In a path a pad name is that pad's centre, name@x,y a point inside that pad or via, vN(x,y) a via of type N, cw(c..) or ccw(c..) an arc to the next point about the centre after c; other vN are vias at no path point)
3V3: C200.1 P200.1 R200.2 TPJ10.1 U200.1 U200.8 | length 46.4
  Signal Layer 3 w0.254: v1(3.625,35) 3.625,36.375 8.55,41.3 18.9,41.3 24.6,35.6 24.6,28.925 25,28.525 25,23.725 25.35,23.375 v1(25.425,23.375) v1@25.425,23.5
  Bottom Layer w0.254: v1(3.625,35) 3.625,35.05 3.588,35.013 3.7,34.9 3.7,34.175 P200.1@3.75,34.125 ; v1@24.625,29.575 24.638,29.563 24.663,29.587 24.725,29.525 U200.1@24.725,28.275 ; U200.8@24.725,25.575 24.725,25.055 24.932,24.848 24.932,24.843 25,24.775 25.025,24.775 ; C200.1@25.025,24.75 25.027,24.748 25.027,24.323 25.3,24.05 R200.2@25.525,24.05 ; v1@25.55,23.375 25.55,24.01 R200.2@25.575,24.035
  Bottom Layer w0.305: v1(25.425,23.375) 25.525,23.275 26.6,23.275 26.425,23.45 TPJ10.1@26.425,23.1
  other v1: 24.65,29.575
5V: D902.2 P200.37 TPJ12.1 | length 31.7
  Signal Layer 3 w1: 26.09,5.596 26.821,5.596 28.175,6.95 28.175,11.75 28.7,12.275 28.7,29.7 27.575,30.825
  Bottom Layer w0.75: D902.2@24.65,5.6 25.775,5.6 ; P200.37@26.795,33.55 26.795,31.13 27.25,30.675 v1@27.575,30.675
  other v1: 25.475,5.3 26.05,5.3 25.475,5.9 26.05,5.9 27.2,30.55 27.775,30.55 27.2,31.1 27.775,31.1
BOARD_ID_SCL: P200.39 TPJ14.1 U200.6 | length 11.1
  Bottom Layer w0.175: U200.6@25.775,25.251 25.775,25.125 26,24.9 26.45,24.9 27.35,25.8 TPJ14.1@27.35,26.2 27.35,26.3 27,26.65 27,27.325 28.8,29.125 28.8,31.625 28.075,32.35 v1(28.075,32.4)
  Bottom Layer w0.5: P200.39@28.065,33.55 28.065,32.41 v1(28.075,32.4)
BOARD_ID_SDA: P200.40 TPJ15.1 U200.5 | length 12.4
  Bottom Layer w0.102: U200.5@26.225,25.575 U200.5@26.225,25.8 ; TPJ15.1@27.3,28.725 TPJ15.1@27.325,28.725
  Bottom Layer w0.175: U200.5@26.225,25.8 26.575,26.15 26.575,27.675 26.775,27.875 26.775,28.225 TPJ15.1@27.35,28.8 28.35,29.8 28.35,31.375 27.433,32.292 27.433,35.208 P200.40@28.025,35.8 ; P200.40@28.038,35.788 P200.40@28.065,35.815 ; P200.40@28.065,36.45 P200.40@28.065,35.815 ; P200.40@28.075,35.825 P200.40@28.065,35.815
BOARD_ID_WP: R200.1 TPJ16.1 U200.7 | length 11.8
  Signal Layer 3 w0.1: v1(25.925,15.425) 25.925,16.275 25.425,16.775 25.425,22.425 26.126,23.126 v1(26.126,24.376)
  Bottom Layer w0.1: v1@26.05,24.25 26.126,24.326 v1(26.126,24.376)
  Bottom Layer w0.175: U200.7@25.225,25.325 25.275,25.275 25.275,25.1 25.475,24.9 R200.1@25.475,24.7 ; TPJ16.1@25.25,14.75 v1(25.925,15.425) ; R200.1@25.7,24.525 25.775,24.525 v1@26.05,24.25
EFR32_PA0: P200.22 P201.5 TPJ8.1 U1.29 | length 60.1
  Top Layer w0.175: v1@3.525,27.9 7.075,27.9 7.663,27.312 8.263,27.312 8.7,26.875 U1.29@8.99,26.875
  Signal Layer 3 w0.1: v1(3.475,27.975) 2.975,28.475 2.975,31.5 3.525,32.05 3.95,32.05 6.325,34.425 6.325,36.45 8.1,38.225 9.3,38.225 10.025,38.95 10.025,39.239 10.961,40.175 12.2,40.175 14.2,38.175 14.2,36.75 16.425,34.525 16.875,34.525 17.225,34.875 v1@17.225,35.075 ; v1@3.575,27.95 3.675,27.85 3.675,27.154 3.025,26.504 3.025,21.825 3.025,19.072 v1@5.924,16.173
  Bottom Layer w0.175: v1@5.8,16.05 5.363,15.613 5.363,15.163 5.663,14.863 6.037,14.863 6.238,14.663 6.238,14.012 5.85,13.625 ; 5.846,13.629 5.843,13.625 5.843,11.385 6.475,10.752 P201.5@6.475,9.55 ; P200.22@16.635,36.45 16.635,35.79 17.3,35.125 v1(17.3,35) 17.3,35.071 17.273,35.098 17.273,31.048 TPJ8.1@16.675,30.45
  other v1: 5.8,16.125
EFR32_PA1: P200.14 P201.23 TPJ2.1 U1.30 | length 52.5
  Top Layer w0.175: v1(6.875,27.326) 6.925,27.326 7.289,26.962 8.056,26.962 8.516,26.502 8.963,26.502 U1.30@8.99,26.475
  Signal Layer 3 w0.1: v1@6.726,27.348 6.875,27.497 6.897,27.497 7.125,27.725 7.125,30.567 8.25,31.692 8.25,32.897 9.128,33.775 9.775,33.775 10.975,34.975 10.95,35 v1(10.9,35) ; v1@11.025,35.025 11.025,34.925 11.275,34.675 11.275,34.45 12.35,33.375 15.575,33.375 15.825,33.125 18.475,33.125 18.775,32.825 19,32.825 19.3,32.525 19.3,31.225 v1@19.775,30.75 ; v1@18.051,11.126 18.401,11.476 18.401,14.724 16.9,16.225 15.259,16.225 15.255,16.22 14.875,16.6 14.875,18.85 15.975,19.95 16.25,19.95 16.875,20.575 16.875,24.625 17.9,25.65 19.45,25.65 20.15,26.35 20.15,30.45 19.825,30.775 19.85,30.8 v1(19.85,30.825)
  Bottom Layer w0.1: v1(10.9,35) v1@10.9,35.126
  Bottom Layer w0.175: v1@10.9,35.126 P200.14@11.555,35.781 ; P201.23@17.905,9.55 17.95,9.595 v1@17.95,10.8
  Bottom Layer w0.3: TPJ2.1@19.25,30.8 TPJ2.1@19.3,30.75
  Bottom Layer w0.5: TPJ2.1@19.3,30.75 19.375,30.825 19.4,30.8 19.425,30.825 v1(19.85,30.825)
  other v1: 17.95,11
EFR32_PA2: P200.13 P201.21 TPJ1.1 U1.31 | length 38.6
  Top Layer w0.175: v1@7.786,26.4 8.123,26.4 8.371,26.152 8.374,26.152 8.424,26.102 U1.31@8.825,26.102
  Signal Layer 3 w0.1: v1@7.712,26.387 8.625,27.3 8.625,28.125 7.8,28.95 7.8,30.359 9.05,31.609 9.05,32.53 9.295,32.775 11.075,32.775 v1(11.15,32.7) ; v1(7.8,26.426) 7.75,26.426 7.525,26.201 7.525,25.1 8.6,24.025 8.6,20.95 7.483,19.833 7.483,18.555 10.638,15.4 14.8,15.4 15,15.2 15.5,15.2 16.025,14.675 v1(16.025,14.45) ; v1@17.2,11.075 17.225,11.1 17.225,13.175 17.926,13.876 v1(18.001,13.876) ; v1@17.226,11.075 17.25,11.051 v1(17.25,11)
  Bottom Layer w0.175: v1(16.025,14.45) 15.975,14.45 16.362,14.063 17.275,14.063 17.438,13.9 17.975,13.9 18.75,14.675 TPJ1.1@18.75,14.75 ; P201.21@16.635,9.55 16.635,10.235 17.22,10.82 17.22,10.99 v1@17.209,11.001 ; v1@17.21,11 v1(17.25,11) ; v1@17.209,11.001 17.159,11.001 17.184,11.026 v1@17.209,11.001
EFR32_PA3: P200.9 P200.15 P201.19 TPJ3.1 U1.32 | length 45.2
  Top Layer w0.175: v1@8.15,25.675 U1.32@8.99,25.675
  Signal Layer 3 w0.1: v1@7.95,25.825 v1(7.963,25.825) ; v1@7.987,25.813 7.975,25.825 v1(7.963,25.825) ; v1(9.55,32.275) 9.45,32.175 9.45,31.726 8.025,30.301 8.025,29.125 8.9,28.25 8.9,26.725 v1@7.987,25.812 ; v1@16.45,10.925 16.5,10.975 v1(16.5,11) 16.5,13.05 17.8,14.35 17.8,14.75 17.801,14.799 16.625,15.975 16.1,15.975 15.525,15.4 15.15,15.4 14.9,15.65 10.671,15.65 7.683,18.638 7.683,19.633 8.925,20.875 8.925,24.15 7.987,25.088 v1@7.987,25.812 ; v1@16.5,10.85 v1@16.5,10.925 ; v1@17.849,14.701 17.926,14.701 v1@17.95,14.725 ; v1(7.963,25.825) 7.963,25.813 7.975,25.8 v1@7.987,25.812
  Bottom Layer w0.175: P200.9@9.015,33.55 9.015,32.885 9.625,32.275 9.95,32.275 10.85,31.375 12,31.375 12.55,31.925 12.55,33.275 P200.15@12.825,33.55 ; P201.19@15.365,9.55 15.365,10.215 16.15,11 v1@16.45,11 ; v1@17.95,14.875 17.95,16.55 TPJ3.1@18.7,17.3
  other v1: 17.801,14.701
EFR32_PA4: P200.8 P200.16 P201.17 TPJ4.1 U1.33 | length 71.7
  Top Layer w0.175: v1@5.575,26.6 6.45,26.6 7.75,25.3 U1.33@9.05,25.3
  Signal Layer 3 w0.1: v1(14.776,11.001) 14.776,11.024 12.994,12.806 10.194,12.806 9.675,13.325 9.675,13.675 9.142,14.208 9.142,15.198 6.281,18.06 6.281,21.102 5.8,21.583 5.8,22.075 6.1,22.375 6.1,23.3 5.6,23.8 5.6,25.5 5.35,25.75 5.35,26.375 5.55,26.575 v1(5.55,26.6) 5.55,26.65 5.35,26.85 5.35,28.175 5.55,28.375 5.55,31.2 6.475,32.125 6.475,32.75 7.775,34.05 7.775,36.25 8.625,37.1 9.875,37.1 11.1,38.325 11.375,38.325 11.7,38.65 12.177,38.65 v1(12.202,38.625) 12.685,38.142 12.685,34.565 13.325,33.925 15.825,33.925 16.05,33.7 18.725,33.7 19.025,33.4 21.575,33.4 22.375,32.6 22.375,31.45 21.8,30.875 21.8,25.45 21.575,25.225 v1@21.575,24.9
  Bottom Layer w0.1: P200.8@7.745,36.45 P200.8@7.775,36.42
  Bottom Layer w0.175: P200.8@7.775,36.42 7.775,35.1 v1@7.8,35.075 ; v1@12.175,38.575 12.825,37.925 P200.16@12.825,36.45 ; P201.17@14.37,9.525 14.37,10.445 v1@14.775,10.85 ; TPJ4.1@20.05,25.55 21.075,25.55 21.588,25.038 21.6,25.05 v1(21.6,24.875)
  other v1: 7.775,35
EFR32_PA5: P200.10 P201.7 U1.34 | length 46.9
  Top Layer w0.175: v1@5.875,25.95 6.605,25.95 7.605,24.95 8.468,24.95 8.543,24.875 U1.34@8.99,24.875
  Signal Layer 3 w0.1: v1(5.825,25.975) 6.05,26.2 6.05,26.738 5.625,27.163 5.625,28.025 5.8,28.2 5.8,31.125 6.75,32.075 6.75,32.625 v1(9.125,35) ; v1@5.975,25.975 5.875,25.875 5.875,23.95 6.375,23.45 6.375,22.25 6.1,21.975 6.1,21.566 6.481,21.185 6.481,18.142 9.342,15.281 9.342,14.333 9.975,13.7 9.975,13.5 10.434,13.041 13.459,13.041 15.176,11.324 15.176,10.835 14.741,10.4 9.7,10.4 9.45,10.65 9.45,10.85 9.224,11.076 8.496,11.076 v1(8.44,11.02)
  Bottom Layer w0.1: P201.7@7.64,10.065 7.95,9.755 P201.7@7.745,9.55 ; P200.10@8.925,36.36 P200.10@9.015,36.45 P200.10@9.015,37.06
  Bottom Layer w0.175: P201.7@7.64,10.065 v1@8.575,11 ; P200.10@8.925,36.36 9.125,36.16 v1(9.125,35)
EFR32_PA6: P200.11 P201.11 U1.35 | length 49.7
  Top Layer w0.175: v1@3.1,27.35 4.375,27.35 5,26.725 5,25.925 5.65,25.275 6.739,25.275 ; 6.763,25.274 7.437,24.6 8.3,24.6 8.425,24.475 U1.35@8.99,24.475
  Signal Layer 3 w0.1: v1@9.075,38.675 9.1,38.65 8.15,38.65 6.05,36.55 6.05,34.6 3.85,32.4 3.5,32.4 2.7,31.6 2.7,27.825 3.05,27.475 3.175,27.475 3.175,27.3 2.75,26.875 2.75,18.975 5.35,16.375 5.35,15.275 5.675,14.95 5.925,14.95 6.125,14.75 6.125,14.3 9.025,11.4 9.425,11.4 v1@9.875,10.95
  Bottom Layer w0.1: P200.11@10.285,33.55 P200.11@10.285,34.19
  Bottom Layer w0.175: v1(9.1,38.7) 9.1,38.775 9.15,38.725 9.1,38.675 9.653,38.122 9.653,34.822 P200.11@10.285,34.19 ; v1@10,10.875 10,9.835 P201.11@10.285,9.55
  other v1: 9.9,10.975 3.175,27.326
EFR32_PA7: P200.12 P201.13 U1.36 | length 42.2
  Top Layer w0.175: v1(3.95,24.925) 3.975,24.9 6.642,24.9 7.328,24.214 8.191,24.214 8.303,24.102 8.963,24.102 U1.36@8.99,24.075 ; v1(4.4,31.625) 4.45,31.575 v1@7.15,31.575
  Signal Layer 3 w0.1: v1(4.4,31.625) 4.45,31.625 4.475,31.65 4.45,31.675 3.25,30.475 3.25,28.9 3.975,28.175 3.975,24.95 v1(3.95,24.925) 3.3,24.275 3.3,19.2 6.325,16.175 6.325,14.383 9.073,11.634 9.966,11.634 v1@10.675,10.925 ; v1@7.2,31.55 7.35,31.7 7.35,32.386 9.014,34.05 9.3,34.05 v1@10.163,34.913 ; v1(10.576,10.976) v1@10.624,10.976
  Bottom Layer w0.1: v1(10.225,35) 10.275,35 v1@10.225,35.05
  Bottom Layer w0.175: v1@10.225,35.05 10.225,36.39 P200.12@10.285,36.45 ; v1(10.576,10.976) 10.626,10.976 v1@10.65,11 ; v1@10.626,10.975 11.113,10.487 11.363,10.487 11.525,10.325 11.525,9.58 P201.13@11.555,9.55 ; v1@10.626,10.976 v1@10.65,11 ; v1@10.725,10.925 v1@10.65,11
  other v1: 7.2,31.575
EFR32_PA8: P200.19 P201.12 TPJ5.1 U1.37 | length 55.4
  Top Layer w0.175: v1(4,24.275) 4.65,24.275 4.889,24.514 6.533,24.514 7.183,23.864 7.975,23.864 7.975,23.7 v1@7.926,23.651 ; 8.2,23.675 8.375,23.675 U1.37@8.99,23.675
  Signal Layer 3 w0.1: v1(4,24.275) 3.575,23.85 3.575,21.925 4.375,21.125 4.375,18.408 6.525,16.258 6.525,14.535 9.191,11.869 10.481,11.869 11.35,11 v1(11.325,11) ; v1@7.95,23.65 7.95,24.225 7.275,24.9 7.275,26.625 7.75,27.1 7.95,27.1 8.35,27.5 8.35,28.025 7.575,28.8 7.575,30.417 8.775,31.617 8.775,32.644 9.356,33.225 11.6,33.225 12.025,32.8 15.336,32.8 15.809,32.327 v1(15.924,32.327) 15.902,32.327 15.95,32.375 17.15,32.375 17.85,31.675 18.3,31.675 19.875,30.1 19.875,27.825 19.651,27.601 v1(19.651,27.126) v1@19.65,27.125
  Bottom Layer w0.1: P201.12@10.285,11.89 P201.12@10.285,12.45 ; v1(15.924,32.327) v1@15.936,32.339
  Bottom Layer w0.175: P201.12@10.285,11.89 10.662,11.513 10.787,11.513 v1@11.3,11 ; P200.19@15.6,32.675 v1@15.936,32.339 ; TPJ5.1@16.55,25.7 17.35,25.7 18.776,27.126 v1(19.651,27.126)
  other v1: 7.95,23.7
EFR32_PA9: P200.20 P201.14 TPJ6.1 U1.38 | length 73.4
  Top Layer w0.175: v1(4.1,23.625) 4.65,23.625 5.025,24 6.552,24 7.038,23.514 7.3,23.514 7.626,23.187 8.361,23.187 8.448,23.275 U1.38@8.99,23.275
  Signal Layer 3 w0.1: v1@11.527,39.475 11.502,39.45 11.014,39.45 10.625,39.061 10.625,38.675 9.575,37.625 8.325,37.625 6.975,36.275 6.975,34.175 5.925,33.125 5.925,32.2 4.3,30.575 4.3,29.625 4.1,29.425 4.1,28.959 4.25,28.809 4.25,25.275 4.475,25.05 4.475,24 v1(4.1,23.625) 3.85,23.375 3.85,22.025 4.65,21.225 4.65,18.416 6.725,16.341 6.725,14.618 9.24,12.103 10.997,12.103 12.1,11 v1@12.1,10.975 ; v1@11.55,39.45 12.05,39.45 12.96,38.54 12.96,34.665 13.425,34.2 15.95,34.2 16.175,33.975 18.875,33.975 19.175,33.675 21.75,33.675 22.65,32.775 22.65,31.3 22.075,30.725 22.075,29.925 22.113,29.888 22.225,30 v1(22.225,29.875)
  Bottom Layer w0.1: P201.14@11.48,13.15 11.48,11.845 12,11.325 v1(12,11)
  Bottom Layer w0.175: v1@11.388,39.488 12.987,39.488 15.075,37.4 15.075,37.275 15.365,36.985 P200.20@15.365,36.45 ; TPJ6.1@20.02,28.07 21.825,29.875 v1(22.225,29.875)
  other v1: 11.551,39.452
EFR32_PA10: P200.21 P201.3 TPJ7.1 U1.39 | length 62.4
  Top Layer w0.175: v1@2.25,22.75 2.3,22.8 4.475,22.8 5.214,23.539 6.518,23.539 6.982,23.075 7.244,23.075 7.481,22.837 8.506,22.837 8.516,22.847 8.517,22.847 8.547,22.878 8.55,22.875 U1.39@8.99,22.875
  Signal Layer 3 w0.1: v1@4.944,16.331 4.881,16.331 4.8,16.25 4.8,16.592 2.45,18.942 2.45,22.251 2.25,22.451 v1(2.25,22.8) 2.25,23.225 2.425,23.4 2.425,31.775 3.325,32.675 3.625,32.675 5.725,34.775 5.725,36.725 8.175,39.175 9.572,39.175 10.897,40.5 12.25,40.5 14.475,38.275 14.475,36.975 16.425,35.025 v1@16.55,35.025 ; v1@16.725,31.925 17.125,31.925 17.65,31.4 17.925,31.4 19.3,30.025 19.3,29.9 v1@19.35,29.85
  Bottom Layer w0.175: v1(4.925,16.175) 4.925,14.175 4.573,13.823 4.573,10.727 5.205,10.095 P201.3@5.205,9.55 ; v1@16.6,34.9 16.6,32.9 16.75,32.75 v1@16.75,31.975 ; TPJ7.1@17.49,28.03 19.36,29.9 v1(19.4,29.9)
  other v1: 16.75,31.9 16.6,35
EFR32_PA11: P200.18 P201.18 U1.40 | length 46.2
  Top Layer w0.175: v1(5.625,23.025) 6.525,23.025 6.9,22.65 7.174,22.65 7.374,22.45 9,22.45 U1.40@9.025,22.475
  Signal Layer 3 w0.1: v1(5.625,23.025) 5.6,23 5.6,21.483 6.081,21.002 6.081,17.833 7.325,16.589 7.325,14.866 8.216,13.975 9.066,13.975 9.35,13.691 9.35,13.125 9.903,12.572 12.603,12.572 14.1,11.075 v1(14.1,11) ; v1@5.763,22.988 5.325,23.425 5.325,25.35 5.075,25.6 5.075,28.425 5.3,28.65 5.3,31.258 6.2,32.158 6.2,32.9 7.3,34 7.3,36.175 8.5,37.375 9.75,37.375 v1(11.2,38.825)
  Bottom Layer w0.1: v1@14.095,11.08 P201.18@14.095,12.45
  Bottom Layer w0.175: v1(11.2,38.825) 11.677,38.825 11.99,39.138 12.487,39.138 13.212,38.413 13.212,37.788 13.513,37.487 13.688,37.487 P200.18@14.025,37.15
EFR32_PC00: RP200.1 U1.1 U100.D2 | length 5
  Top Layer w0.1: v2@19.199,20.151 v2@19.224,20.175
  Top Layer w0.175: U1.1@15.86,21.675 16.212,21.675 16.912,20.975 18.35,20.975 19.074,20.251 v2@19.199,20.251 ; v2@19.2,20.125 19.2,20.15 U100.D2@19.875,20.15
  Bottom Layer w0.5: RP200.1@19.15,19.9 19.225,19.975 v2(19.225,20.175)
EFR32_PC01: RP200.4 U1.2 U100.C3 | length 8.8
  Top Layer w0.175: U1.2@15.86,22.075 16.307,22.075 17.057,21.325 18.675,21.325 19.025,20.975 v1@19.225,20.975 ; U100.C3@20.075,19.8 20.075,19.425 v2@20.375,19.125
  Signal Layer 3 w0.1: v1@19.15,20.975 19.529,20.596 19.85,20.275 19.85,19.528 20.375,19.003 20.351,18.979 20.33,19 v2(20.3,19)
  Bottom Layer w0.175: RP200.4@19.075,18.375 19.125,18.325 19.6,18.325 20.275,19 v2(20.3,19) v2@20.338,18.962
  other v1: 19.2,20.85
EFR32_PC02: RP200.2 U1.3 U100.E1 | length 10.3
  Top Layer w0.175: U1.3@15.86,22.475 15.86,22.447 16.429,22.447 17.202,21.675 19.425,21.675 20,21.1 v2@20.025,21.1 ; U100.E1@19.675,20.5 19.675,20.625 v2@20,20.95
  Signal Layer 3 w0.1: v2@19.864,20.964 20.15,20.678 20.15,19.85 v2@21.025,18.975 ; v2(21,18.975) v2@21.025,18.975 ; v2@21.025,18.975 21.075,18.925 21.1,18.95 21.075,18.975 v2@21.025,18.975
  Bottom Layer w0.175: RP200.2@19.15,19.35 19.175,19.325 19.85,19.325 20.1,19.575 20.455,19.575 21,19.03 v2(21,18.975)
  other v2: 19.975,21.075
EFR32_PC03: R103.1 U1.4 U100.A3 | length 9.8
  Top Layer w0.175: U1.4@15.86,22.875 16.497,22.875 17.347,22.025 19.8,22.025 20.026,21.799 v2(20.026,21.826) ; U100.A3@20.5,19.775 20.775,19.5 21.55,19.5 v2@21.575,19.5 ; v2(21.476,19.501) 21.601,19.501 21.85,19.75 R103.1@21.85,20.05
  Signal Layer 3 w0.1: v2(20.026,21.826) 20.453,21.397 20.453,19.992 20.69,19.754 20.922,19.522 20.925,19.525 20.949,19.501 v2(21.476,19.501)
EFR32_PD00: U1.56 X2.1 | length 2.5
  Top Layer w0.175: U1.56@15.025,20.575 15.5,20.575 16.15,19.925 X2.1@17.3,19.925
EFR32_PD01: U1.55 X2.2 | length 4.6
  Top Layer w0.175: U1.55@14.643,20.822 U1.55@14.625,20.84 14.625,20.393 14.871,20.147 15.3,20.147 15.897,19.55 16.175,19.55 16.975,18.75 16.975,18.2 X2.2@17.55,18.2
EFR32_PD02: R216.2 R217.1 U1.54 | length 6.4
  Top Layer w0.175: U1.54@14.225,20.84 14.225,20.298 14.898,19.625 14.907,19.635 v1(15.025,19.635)
  Signal Layer 3 w0.1: v1@14.425,16.175 14.475,16.225 14.475,19.025 15.086,19.636 v1@15.086,19.814
  Bottom Layer w0.175: R217.1@14.15,15.325 14.15,15.775 v1(14.475,16.1)
EFR32_PD06: D900.4 P900.3 TPJ18.1 U1.49 | length 24
  Top Layer w0.22: 12.225,20.275 U1.49@12.225,20.84
  Top Layer w0.23: P900.3@6.845,4.15 6.775,4.22 6.775,5.5 D900.4@6.85,5.575 ; 7.355,6.08 D900.4@6.95,5.675 ; 12.227,20.352 12.227,19.448 13.075,18.6 13.075,16.05 12.175,15.15 8.6,15.15 7.235,13.785 7.235,7.165 7.453,6.947 7.453,6.178 D900.4@6.95,5.675 ; D900.4@6.85,5.575 D900.4@6.95,5.675 ; D900.4@6.85,5.575 D900.4@6.95,5.675
  Bottom Layer w0.23: v3(8.375,14.625) 8.4,14.625 9.125,15.35 TPJ18.1@9.125,15.4 ; TPJ18.1@9.15,15.42 TPJ18.1@9.25,15.32
EFR32_PD07: D900.5 P900.2 TPJ19.1 U1.48 | length 23.5
  Top Layer w0.22: 11.825,20.125 U1.48@11.825,20.84
  Top Layer w0.23: P900.2@6.195,4.15 6.15,4.195 6.15,6.05 6.725,6.625 6.925,6.625 D900.5@6.95,6.65 ; D900.5@6.975,6.625 D900.5@6.95,6.65 ; 11.822,20.337 11.822,19.28 12.67,18.432 12.67,16.22 12.025,15.575 8.4,15.575 6.83,14.005 6.83,6.645 6.888,6.587 D900.5@6.95,6.65
  Bottom Layer w0.23: TPJ19.1@7.025,14.525 7.75,15.25 v3(7.775,15.25)